# Altium PCB Embedded-DCAC-UPS-PoC.PcbDoc (part 1 of 2)
Units mm, origin at the board's own origin, x right, y up, seen from the top; angles counter-clockwise.
Board outline 165 x 165 mm, 2 copper layers (Top Layer, Bottom Layer), stack 1.58 mm thick; 80 components, 51 nets, 294 pads, 58 vias.
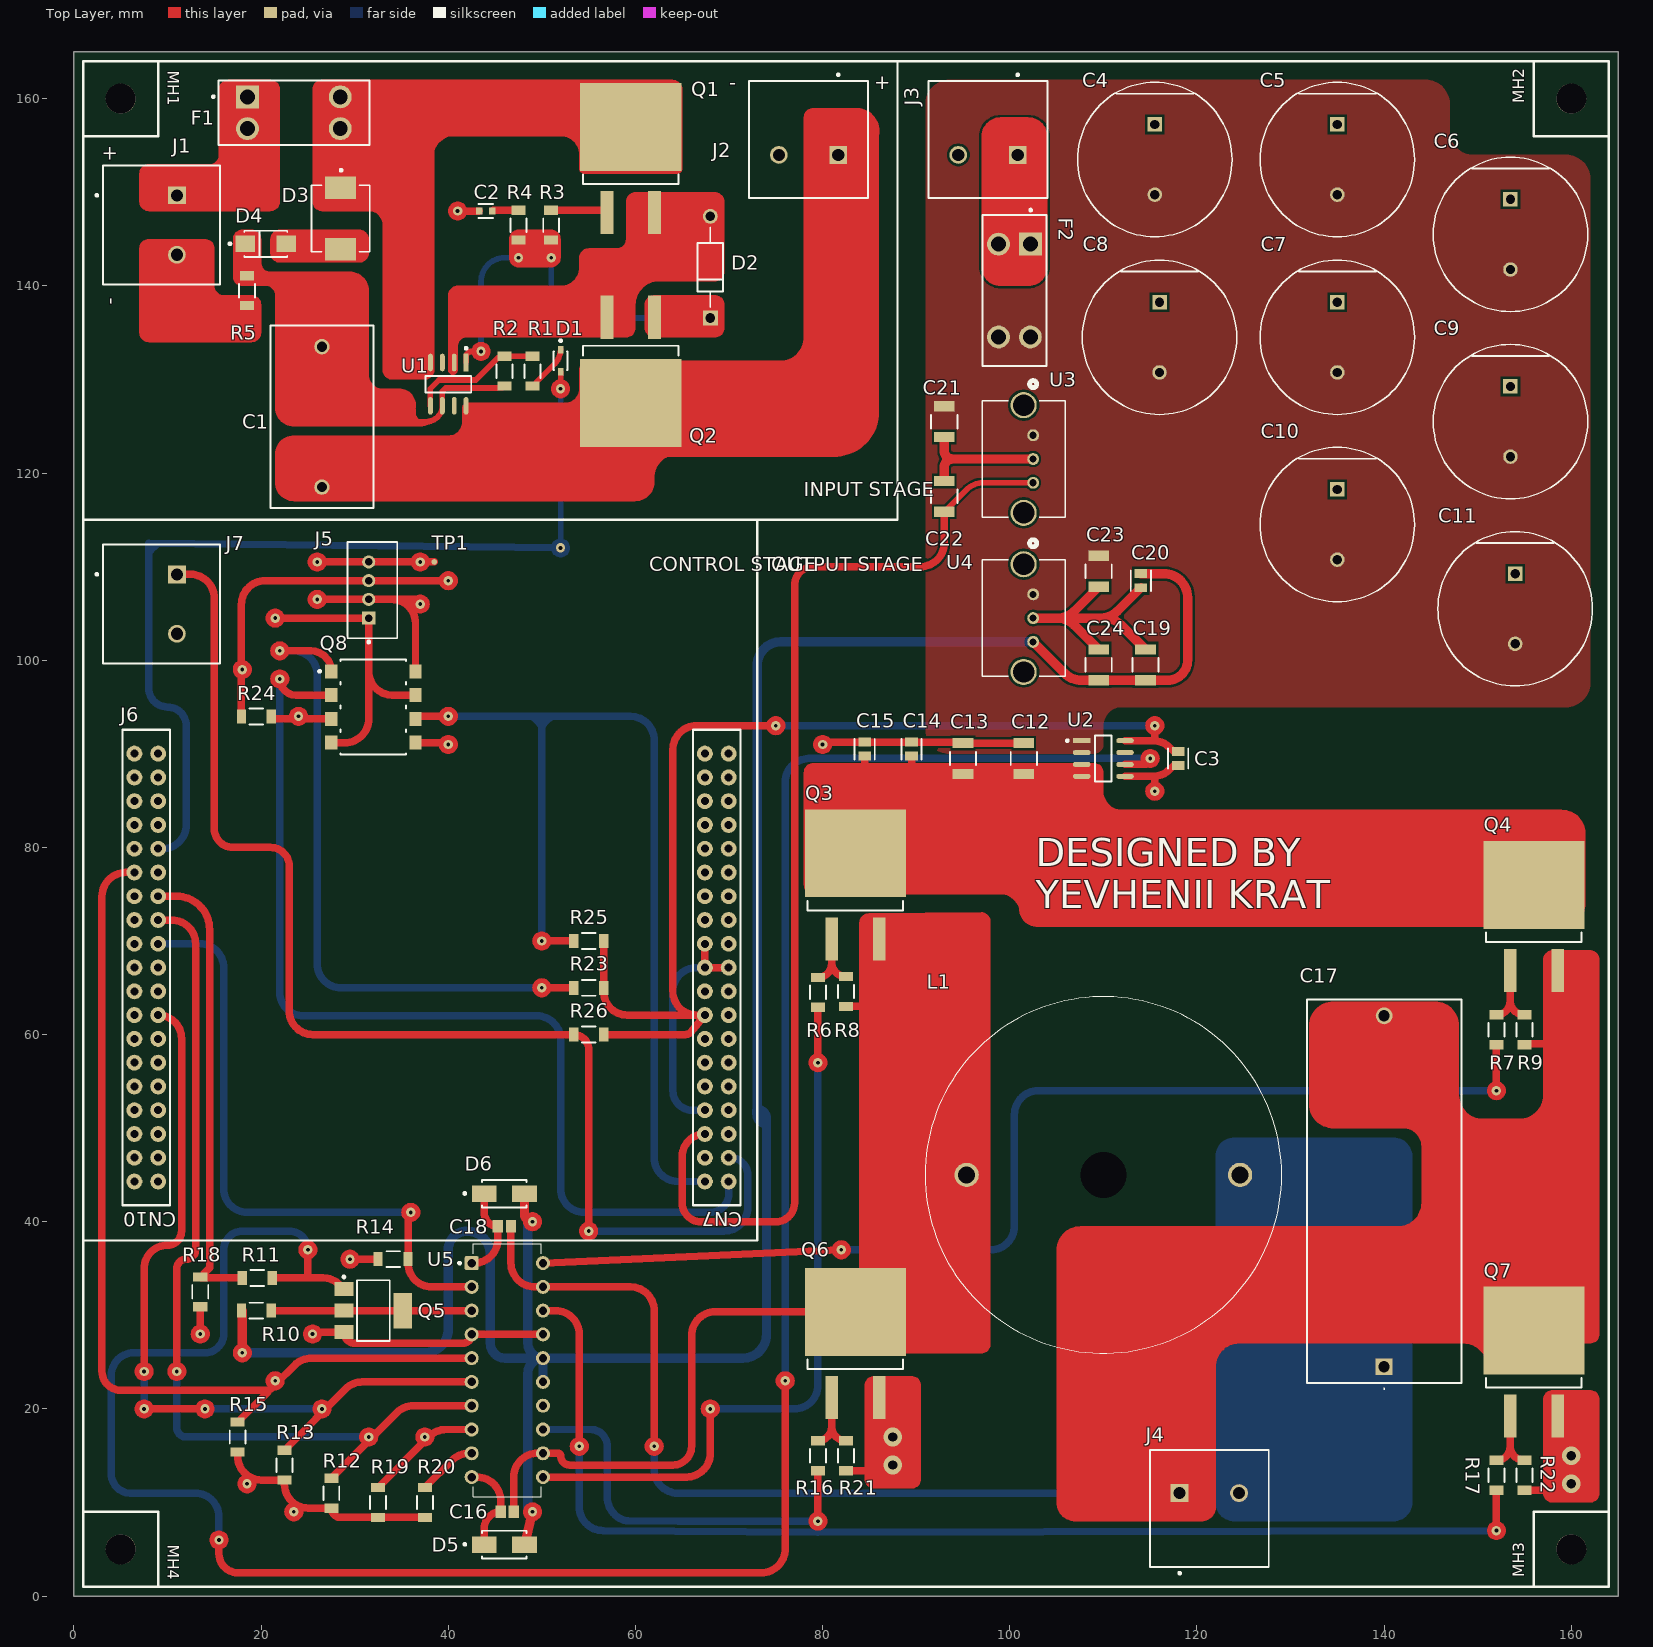
[diagram p0: Top Layer view]
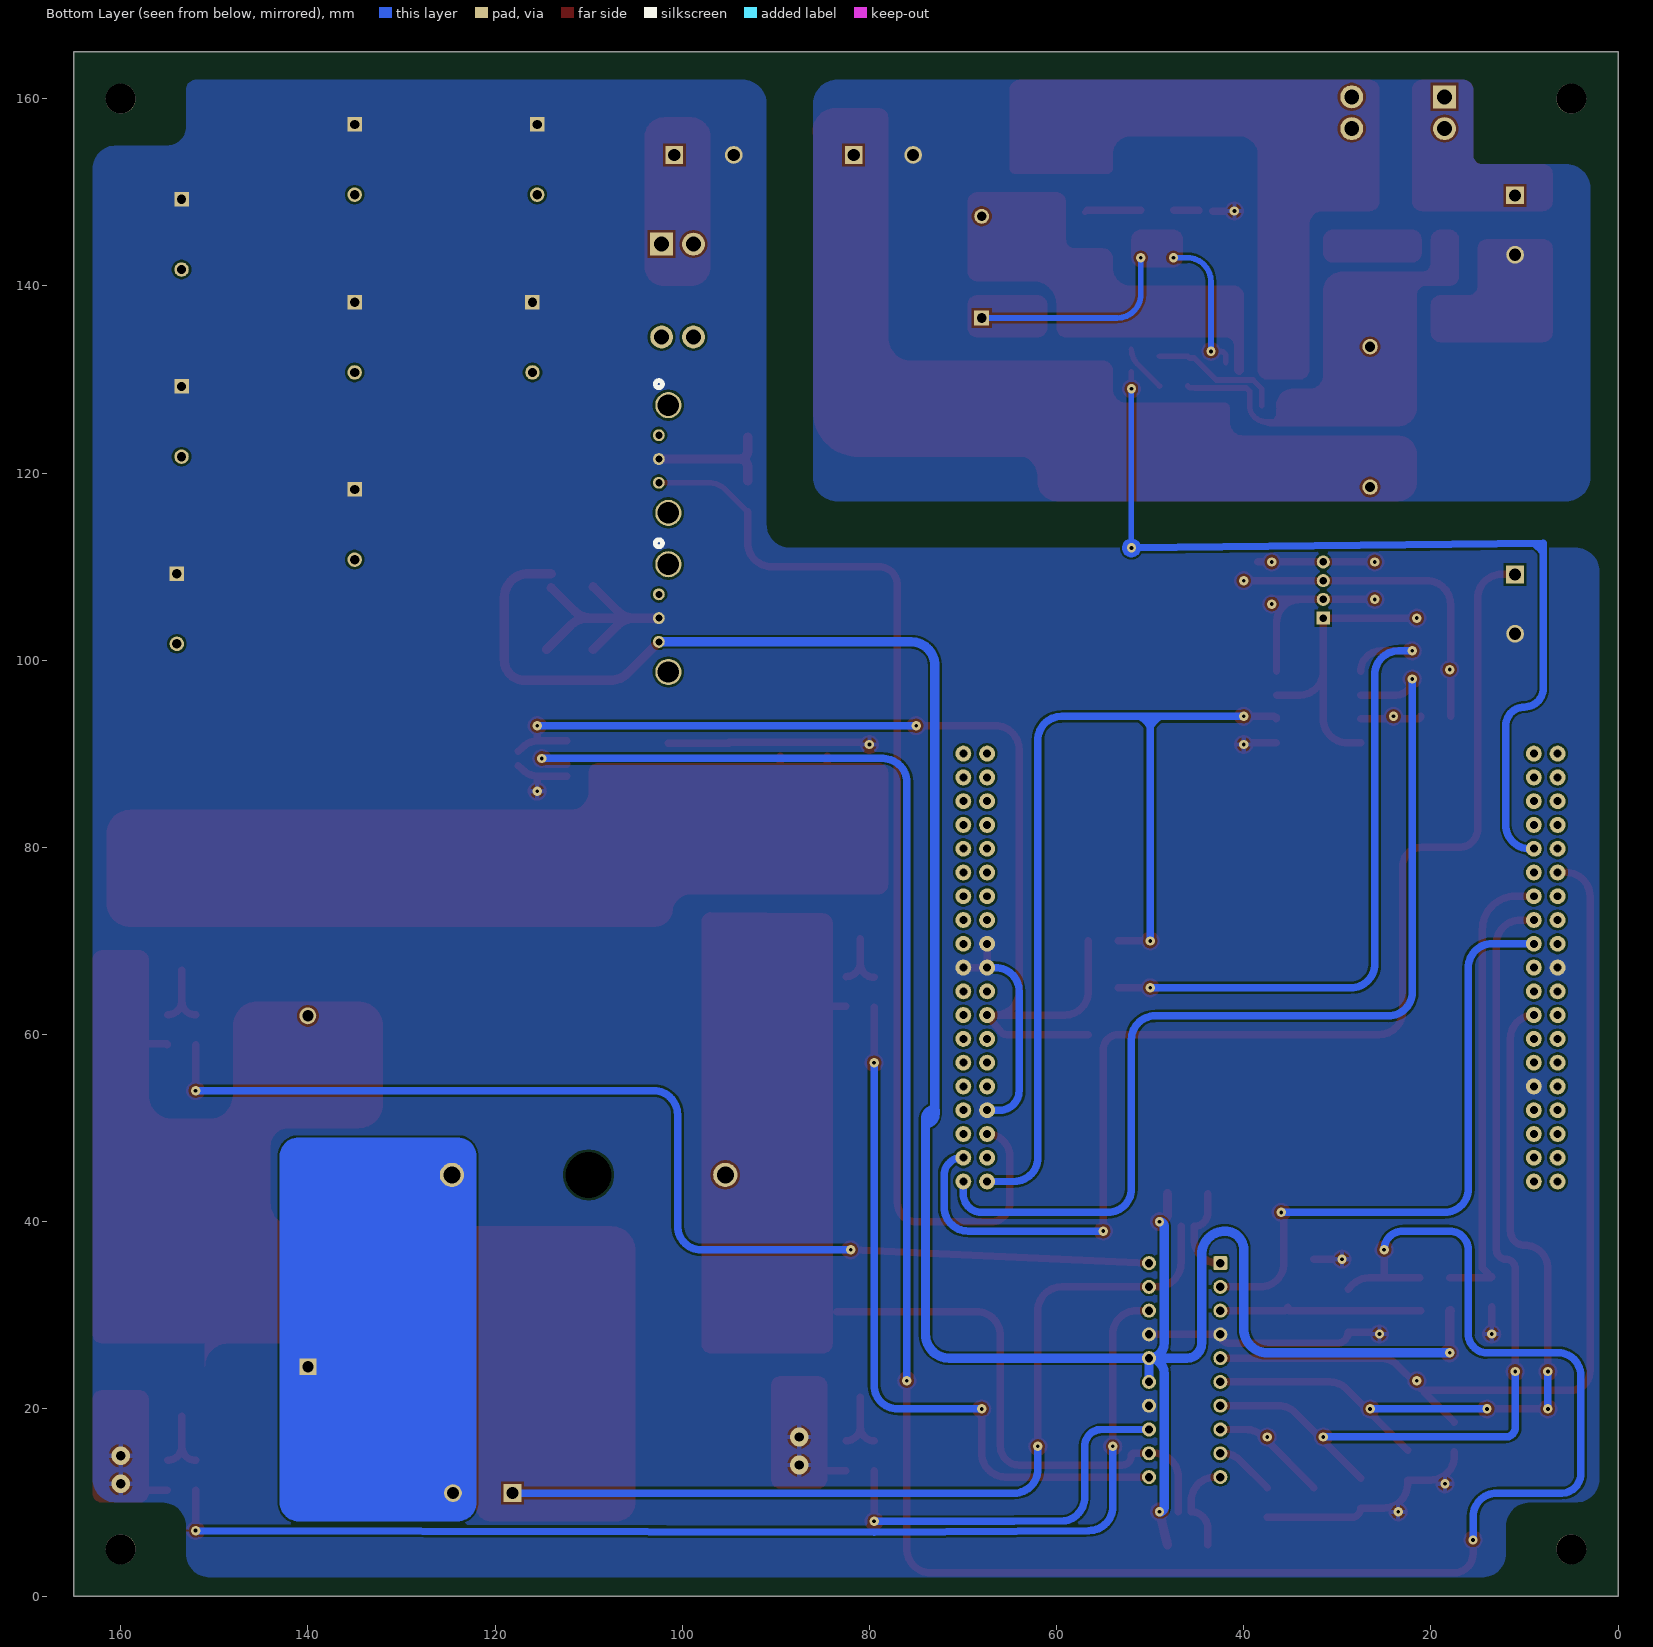
[diagram p1: Bottom Layer view, seen from below]

## Layer stack, top to bottom
Top Solder: solder mask 0.0102, Solder Resist, Dk 3.5
Top Layer: signal copper 0.0711
Dielectric 1: dielectric 1.4374, FR-4, Dk 4.8
Bottom Layer: signal copper 0.0711
Bottom Solder: solder mask 0.0102, Solder Resist, Dk 3.5

## Board outline
0,0 0,165 165,165 165,0

## Design rules (kind name [scope] priority, off if disabled: settings)
BoardOutlineClearance [All] p1: gap=0.5 ignorepadtopadclearanceinfootprint=FALSE
Clearance [All] p1: gap=0.254 ignorepadtopadclearanceinfootprint=FALSE
Height [All] p1: minheight=0 maxheight=40 prefheight=12.7
HoleSize [All] p1: absolutevalues=TRUE maxlimit=5 minlimit=0.025 maxpercent=80.000 minpercent=20.000
HoleToHoleClearance [All] p1: gap=0.5 allowstackedmicrovias=TRUE
MinimumAnnularRing [All] p1: minimumring=0.254
MinimumSolderMaskSliver [All] p1: minsoldermaskwidth=0.2
PolygonConnect [All] p1: connectstyle=Direct reliefconductorwidth=0.5 reliefentries=4 polygonreliefangle="90 Angle" airgapwidth=0.254
RoutingVias [All] p1: holewidth=0.4 width=1 viastyle="Through Hole" minholewidth=0.4 minwidth=1 maxholewidth=1 maxwidth=2
SilkToSilkClearance [All] p1: silktosilkclearance=0.15
SilkToSolderMaskClearance [IsPad] p1: minsilkscreentomaskgap=0.15 clearancetoexposedcopper=TRUE
SolderMaskExpansion [All] p1: expansion=0 istentingtop=FALSE
SupplyNets "Schematic Supply Nets_4" [InNet('BAT_OUT-')] p1: voltage=0.000
SupplyNets "Schematic Supply Nets_3" [InNet('BAT_IN+')] p2: voltage=0.000
SupplyNets "Schematic Supply Nets_2" [InNet('BAT_OUT+')] p3: voltage=0.000
SupplyNets "Schematic Supply Nets_1" [InNet('VIN+')] p4: voltage=0.000
SupplyNets "Schematic Supply Nets" [InNet('VIN-')] p5: voltage=0.000
Width [All] p1: maxlimit=5 minlimit=0.254 preferedwidth=0.5 minimp=50.000000 maximp=50.000000 favimp=50.000000
24 further rules are at their usual default settings.

## Classes and differential pairs
component class Output_Stage: C3 C4 C5 C6 C7 C8 C9 C10 C11 C12 C13 C14 C15 C16 C17 C18 C19 C20 C21 C22 C23 C24 D5 D6 F2 J3 J4 L1 Q3 Q4 Q5 Q6 Q7 R6 R7 R8 R9 R10 R11 R12 R13 R14 R15 R16 R17 R18 R19 R20 R21 R22 U2 U3 U4 U5
component class Input_Stage: C1 C2 D1 D2 D3 D4 F1 J1 J2 Q1 Q2 R1 R2 R3 R4 R5 U1
component class Control_Stage: J5 J6 J7 Q8 R23 R24 R25 R26 TP1

## Components (designator, comment, footprint, x,y, rotation, side; value= is the part's Value field where it differs from the comment)
C1 "2.2uF 5%" WCAP-FTBP_L18W10H16.5 26.5,126 r90 top
C2 "10nF 10%" FP-C1608-080-0_1-MFG 44,148 r180 top
C3 "100nF 10%" FP-C0805C-DN-MFG 118,89.5 r270 top value="0.10 μF"
C4 "680uF 20%" FP-RAD-TH-D_16_0_5-L_25_2-MFG 115.5,153.5 r270 top
C5 "680uF 20%" FP-RAD-TH-D_16_0_5-L_25_2-MFG 135,153.5 r270 top
C6 "680uF 20%" FP-RAD-TH-D_16_0_5-L_25_2-MFG 153.5,145.5 r270 top
C7 "680uF 20%" FP-RAD-TH-D_16_0_5-L_25_2-MFG 135,134.5 r270 top
C8 "680uF 20%" FP-RAD-TH-D_16_0_5-L_25_2-MFG 116,134.5 r270 top
C9 "680uF 20%" FP-RAD-TH-D_16_0_5-L_25_2-MFG 153.5,125.5 r270 top
C10 "680uF 20%" FP-RAD-TH-D_16_0_5-L_25_2-MFG 135,114.5 r270 top
C11 "680uF 20%" FP-RAD-TH-D_16_0_5-L_25_2-MFG 154,105.5 r270 top
C12 "4.7uF 10%" FP-CNA6P-MFG 101.5,89.5 r90 top value=4.7uF
C13 "4.7uF 10%" FP-CNA6P-MFG 95,89.5 r90 top value=4.7uF
C14 "100nF 10%" FP-C0805C-DN-MFG 89.5,90.5 r270 top value="0.10 μF"
C15 "100nF 10%" FP-C0805C-DN-MFG 84.5,90.5 r270 top value="0.10 μF"
C16 "1uF 25V" CAPC2013X140X50LL20T25 46.3,9 r0 top
C17 "PHE426HR8100JR06L2" PHE426HR8100JR06L2 140,24.5 r90 top
C18 "1uF 25V" CAPC2013X140X50LL20T25 46,39.5 r0 top
C19 "4.7uF 10%" FP-CNA6P-MFG 114.5,99.5 r90 top value=4.7uF
C20 "100nF 10%" FP-C0805C-DN-MFG 114,108.5 r90 top value="0.10 μF"
C21 "4.7uF 10%" FP-CNA6P-MFG 93,125.5 r90 top value=4.7uF
C22 "10uF 10%" FP-C3225-250-0_4-MFG 93,117.5 r270 top
C23 "4.7uF 10%" FP-CNA6P-MFG 109.5,109.5 r90 top value=4.7uF
C24 "10uF 10%" FP-C3225-250-0_4-MFG 109.5,99.5 r270 top
D1 "BAV21WS-E3-08" FP-S8-V-3910_02-001-MFG 52,132 r270 top
D2 "Zener 12V" FP-017AH-MFG 68,142 r90 top
D3 "TVS 33V" FP-SMCJ-MFG 28.5,147.2 r270 top
D4 "TVS 24V" FP-SMAJ-MFG 20.5,144.5 r0 top
D5 "ES1D" FP-403AE-MFG 46,5.5 r0 top value=7pF
D6 "ES1D" FP-403AE-MFG 46,43 r0 top value=7pF
F1 "Fuse Holder 30A" FP-3568-MFG 23.5,158.5 r0 top
F2 "Fuse Holder 30A" FP-3568-MFG 100.5,139.5 r270 top
J1 "10-24 AWG" PHOE-1714955_V 11,146.5 r270 top
J2 "10-24 AWG" PHOE-1714955_V 78.5,154 r180 top
J3 "10-24 AWG" PHOE-1714955_V 97.675,154 r180 top
J4 "10-24 AWG" PHOE-1714955_V 121.325,11 r0 top
J5 "110990030" FP-110990030-MFG 31.9,107.5 r90 top
J6 "NUCLEO_L476RGT6_Headers" NUCLEO_L4764RGT6_Header 38.21,67.16 r180 top
J7 "10-24 AWG" PHOE-1714955_V 11,106 r270 top
L1 "1140-101K-RC" 1140101KRC 95.395,45 r0 top
Q1 "N-MOSFET 80V" FP-PG-TO263-3-MFG 59.5,153.625 r0 top
Q2 "N-MOSFET 80V" FP-PG-TO263-3-MFG 59.5,130.875 r180 top
Q3 "AHO" FP-PG-TO263-3-MFG 83.5,76 r0 top
Q4 "BHO" FP-PG-TO263-3-MFG 156,72.625 r0 top
Q5 "PZT3904T1G" ONSC-SOT-223-4-318E-04_V 32,30.5 r0 top
Q6 "ALO" FP-PG-TO263-3-MFG 83.5,27 r0 top
Q7 "BLO" FP-PG-TO263-3-MFG 156,25 r0 top
Q8 "LTV-827S-TA1" FP-LTV-827S-TA1-MFG 32,95 r0 top
R1 "1.02kR 1% 0.25W" FP-RT1206-MFG 49,130.9 r90 top value=1.02KΩ
R2 "47kR 1% 0.25W" FP-RT1206-MFG 46,130.9 r270 top value=47KΩ
R3 "10R 1% 0.25W" FP-RT1206-MFG 51,146.5 r90 top value=10Ω
R4 "10kR 1% 0.25W" FP-RT1206-MFG 47.5,146.5 r90 top value=10KΩ
R5 "1.02kR 1% 0.25W" FP-RT1206-MFG 18.5,139.5 r270 top value=1.02KΩ
R6 "10R 1% 0.25W" FP-RT1206-MFG 79.5,64.5 r270 top value=10Ω
R7 "10R 1% 0.25W" FP-RT1206-MFG 152,60.5 r270 top value=10Ω
R8 "10kR 1%" FP-RT1206-MFG 82.5,64.6 r270 top value=10KΩ
R9 "10kR 1%" FP-RT1206-MFG 155,60.5 r270 top value=10KΩ
R10 "10kR 1% 0.25W" FP-RT1206-MFG 19.5,30.5 r0 top value=10KΩ
R11 "4.7kR 1% 0.25W" FP-RT1206-MFG 19.6,34 r0 top value=4.7KΩ
R12 "4.7kR 1% 0.25W" FP-RT1206-MFG 27.5,11 r90 top value=4.7KΩ
R13 "4.7kR 1% 0.25W" FP-RT1206-MFG 22.5,14 r90 top value=4.7KΩ
R14 "4.7kR 1% 0.25W" FP-RT1206-MFG 34.1,36 r0 top value=4.7KΩ
R15 "4.7kR 1% 0.25W" FP-RT1206-MFG 17.5,17 r90 top value=4.7KΩ
R16 "10R 1% 0.25W" FP-RT1206-MFG 79.5,15 r270 top value=10Ω
R17 "10R 1% 0.25W" FP-RT1206-MFG 152,12.9 r270 top value=10Ω
R18 "100k 0.1%" FP-RT1206-MFG 13.5,32.5 r270 top value=100KΩ
R19 "100k 0.1%" FP-RT1206-MFG 32.5,10 r270 top value=100KΩ
R20 "100k 0.1%" FP-RT1206-MFG 37.5,10 r270 top value=100KΩ
R21 "10kR 1%" FP-RT1206-MFG 82.5,15 r270 top value=10KΩ
R22 "10kR 1%" FP-RT1206-MFG 155,12.9 r270 top value=10KΩ
R23 "680R 1% 0.25W" FP-RT1206-MFG 55,65 r180 top value=680Ω
R24 "680R 1% 0.25W" FP-RT1206-MFG 19.5,94 r0 top value=680Ω
R25 "3.3kR 1% 0.25W" FP-RT1206-MFG 55,70 r180 top value=3.3KΩ
R26 "10kR 1% 0.25W" FP-RT1206-MFG 55,60 r180 top value=10KΩ
TP1 "TPAD6R" TP06R 38.5,110.5 r0 top
U1 "IDEAL DIODE CONTROLLER" FP-S8-8-05-08-1610-IPC_C 40,129.5 r270 top
U2 "ACS711ELCTR-12AB-T" FP-LC-8-IPC_C 110,89.5 r0 top
U3 "TSR 1-4850WI" TSR1WI-SINGLE_TRP 102.5,124.04 r270 top
U4 "TSR 1-48120WI" TSR1WI-SINGLE_TRP 102.5,107.04 r270 top
U5 "HIP4081AIPZ" DIP762W46P254L2590H533Q20_E20_3_N 46.31,24.15 r0 top

## Footprints (in the part's own frame and the unit in brackets; to place one, negate y for a bottom-side part, rotate by r counter-clockwise, add the part's x,y. Pads: shape width x height; smd on the part's side, far side on the other; paste and mask are expansions set on the pad)
1140101KRC [mm]
  round 2.6 hole 1.826: 1(0,0) 2(29.21,0)
  round 2.451 hole 4.902 unplated: 3(14.605,0)
  silkscreen extent -4.44,-19.05 33.66,19.05, body extent -4.45,-19.05 33.65,19.05, height 26.35
CAPC2013X140X50LL20T25 [mm] "Chip Capacitor, 2-Leads, Body 2.00x1.25mm, IPC High Density"
  rect 1.1x1.35 smd: 1(-0.7,0) 2(0.7,0)
  body extent -1.1,-0.72 1.1,0.72, height 1.4
DIP762W46P254L2590H533Q20_E20_3_N [mm] "DIP, Lead Span 7.62mm, Lead Width 0.46mm, Pitch 2.54mm, Body Length 25.90mm, Height 5.33mm, IPC Medium Density"
  rrect25% 1.5x1.5 hole 0.9: 1(-3.81,11.43)
  round 1.5 hole 0.9: 2(-3.81,8.89) 3(-3.81,6.35) 4(-3.81,3.81) 5(-3.81,1.27) 6(-3.81,-1.27) 7(-3.81,-3.81) 8(-3.81,-6.35) 9(-3.81,-8.89) 10(-3.81,-11.43) 11(3.81,-11.43) 12(3.81,-8.89) 13(3.81,-6.35) 14(3.81,-3.81) 15(3.81,-1.27) 16(3.81,1.27) 17(3.81,3.81) 18(3.81,6.35) 19(3.81,8.89) 20(3.81,11.43)
  silkscreen extent -5.23,-13.51 3.62,13.51, body extent -3.95,-12.95 3.95,12.95, height 5.33
FP-017AH-MFG [mm]
  rect 1.6x1.6 hole 1.05 paste-2539.97 mask+0: 1(-5.438,0)
  round 1.6 hole 1.05 paste-2539.97 mask+0: 2(5.438,0)
  silkscreen extent -4.24,-1.36 4.24,1.36, body extent -6.34,-1.46 6.34,1.46, height 0.25
FP-403AE-MFG [mm]
  rect 2.65x1.75 smd paste+0 mask+0: 1(-2.15,0) 2(2.15,0)
  silkscreen extent -4.35,-1.48 2.37,1.48, body extent -3.57,-1.58 3.57,1.58, height 0.25
FP-3568-MFG [mm]
  round 2.45 hole 1.6 paste-2539.97 mask+0: 1(-4.96,-1.7) 2(4.96,-1.7) 2(4.96,1.7)
  rect 2.45x2.45 hole 1.6 paste-2539.97 mask+0: 1(-4.96,1.7)
  silkscreen extent -8.72,-3.43 8.07,3.43, body extent -8.17,-3.53 8.17,3.53, height 0.25
FP-110990030-MFG [mm]
  rect 1.4x1.4 hole 0.8 paste-2539.97 mask+0: 1(-3,0.4)
  round 1.4 hole 0.8 paste-2539.97 mask+0: 2(-1,0.4) 3(1,0.4) 4(3,0.4)
  silkscreen extent -5.67,-2.65 5.15,2.65, body extent -5.25,-2.75 5.25,2.75, height 0.25
FP-C0805C-DN-MFG [mm]
  rect 0.95x1.35 smd paste+0 mask+0: 1(-0.75,0) 2(0.75,0)
  silkscreen extent -1.1,-1.07 1.1,1.07, body extent -1.4,-0.85 1.4,0.85, height 0.25
FP-C1608-080-0_1-MFG [mm]
  rect 0.7x0.7 smd paste+0 mask+0: 1(-0.7,0) 2(0.7,0)
  silkscreen extent -0.8,-0.75 0.8,0.75, body extent -1.15,-0.55 1.15,0.55, height 0.25
FP-C3225-250-0_4-MFG [mm]
  rect 1.1x2.2 smd paste+0 mask+0: 1(-1.65,0) 2(1.65,0)
  silkscreen extent -0.72,-1.4 0.72,1.4, body extent -2.3,-1.5 2.3,1.5, height 0.25
FP-CNA6P-MFG [mm]
  rect 1.1x2.2 smd paste+0 mask+0: 1(-1.65,0) 2(1.65,0)
  silkscreen extent -0.72,-1.4 0.72,1.4, body extent -2.3,-1.5 2.3,1.5, height 0.25
FP-LC-8-IPC_C [mm]
  rect 1.874x0.542 smd paste+0 mask+0: 1(-2.316,1.905)
  rrect100% 1.874x0.542 smd paste+0 mask+0: 2(-2.316,0.635) 3(-2.316,-0.635) 4(-2.316,-1.905) 5(2.316,-1.905) 6(2.316,-0.635) 7(2.316,0.635) 8(2.316,1.905)
  silkscreen extent -3.97,-2.45 0.88,2.45, body extent -3.35,-2.55 3.35,2.55, height 0.25
FP-LTV-827S-TA1-MFG [mm]
  rect 1.3x1.5 smd paste+0 mask+0: 1(-4.5,3.81) 2(-4.5,1.27) 3(-4.5,-1.27) 4(-4.5,-3.81) 5(4.5,-3.81) 6(4.5,-1.27) 7(4.5,1.27) 8(4.5,3.81)
  silkscreen extent -5.87,-5.09 3.5,5.09, body extent -5.25,-5.19 5.25,5.19, height 0.25
FP-PG-TO263-3-MFG [mm]
  rect 1.35x4.6 smd paste-1000 mask+0: 1(-2.54,-5.775) 3(2.54,-5.775)
  rect 10.8x9.4 smd paste-1000 mask+0: 4(0,3.375)
  silkscreen extent -5.1,-2.73 5.1,-1.7, body extent -5.5,-8.18 5.5,8.18, height 0.25
FP-RAD-TH-D_16_0_5-L_25_2-MFG [mm]
  rect 1.55x1.55 hole 1 paste-2539.97 mask+0: 1(-3.75,0)
  round 1.55 hole 1 paste-2539.97 mask+0: 2(3.75,0)
  silkscreen extent -8.25,-8.25 8.25,8.25, body extent -8.35,-8.35 8.35,8.35, height 0.25
FP-RT1206-MFG [mm]
  rect 1x1.5 smd paste+0 mask+0: 1(-1.6,0) 2(1.6,0)
  silkscreen extent -0.72,-0.85 0.72,0.85, body extent -2.2,-0.95 2.2,0.95, height 0.25
FP-S8-8-05-08-1610-IPC_C [mm]
  rect 1.877x0.521 smd paste+0 mask+0: 1(-2.313,1.905)
  rrect100% 1.877x0.521 smd paste+0 mask+0: 2(-2.313,0.635) 3(-2.313,-0.635) 4(-2.313,-1.905) 5(2.313,-1.905) 6(2.313,-0.635) 7(2.313,0.635) 8(2.313,1.905)
  silkscreen extent -3.95,-2.45 0.87,2.45, body extent -3.35,-2.55 3.35,2.55, height 0.25
FP-S8-V-3910_02-001-MFG [mm]
  rect 0.8x0.6 smd paste+0 mask+0: 1(-1.2,0) 2(1.2,0)
  silkscreen extent -2.27,-0.75 0.97,0.75, body extent -1.7,-0.85 1.7,0.85, height 0.25
FP-SMAJ-MFG [mm]
  rect 2.1x1.8 smd paste+0 mask+0: 1(-2.2,0) 2(2.2,0)
  silkscreen extent -3.95,-1.4 2.3,1.4, body extent -3.35,-1.5 3.35,1.5, height 0.25
FP-SMCJ-MFG [mm]
  rect 2.4x3.3 smd paste+0 mask+0: 1(-3.3,0) 2(3.3,0)
  silkscreen extent -5.27,-3.11 3.55,3.11, body extent -4.6,-3.21 4.6,3.21, height 0.25
NUCLEO_L4764RGT6_Header [mm]
  round 1.7 hole 0.85: 1(-31.75,22.86) 2(-29.21,22.86) 3(-31.75,20.32) 4(-29.21,20.32) 5(-31.75,17.78) 6(-29.21,17.78) 7(-31.75,15.24) 8(-29.21,15.24) 9(-31.75,12.7) 10(-29.21,12.7) 11(-31.75,10.16) 12(-29.21,10.16) 13(-31.75,7.62) 14(-29.21,7.62) 15(-31.75,5.08) 16(-29.21,5.08) 17(-31.75,2.54) 18(-29.21,2.54) 19(-31.75,0) 20(-29.21,0) 21(-31.75,-2.54) 22(-29.21,-2.54) 23(-31.75,-5.08) 24(-29.21,-5.08) 25(-31.75,-7.62) 26(-29.21,-7.62) 27(-31.75,-10.16) 28(-29.21,-10.16) 29(-31.75,-12.7) 30(-29.21,-12.7) 31(-31.75,-15.24) 32(-29.21,-15.24) 33(-31.75,-17.78) 34(-29.21,-17.78) 35(-31.75,-20.32) 36(-29.21,-20.32) 37(-31.75,-22.86) 38(-29.21,-22.86) 39(29.21,22.86) 40(31.75,22.86) 41(29.21,20.32) 42(31.75,20.32) 43(29.21,17.78) 44(31.75,17.78) 45(29.21,15.24) 46(31.75,15.24) 47(29.21,12.7) 48(31.75,12.7) 49(29.21,10.16) 50(31.75,10.16) 51(29.21,7.62) 52(31.75,7.62) 53(29.21,5.08) 54(31.75,5.08) 55(29.21,2.54) 56(31.75,2.54) 57(29.21,0) 58(31.75,0) 59(29.21,-2.54) 60(31.75,-2.54) 61(29.21,-5.08) 62(31.75,-5.08) 63(29.21,-7.62) 64(31.75,-7.62) 65(29.21,-10.16) 66(31.75,-10.16) 67(29.21,-12.7) 68(31.75,-12.7) 69(29.21,-15.24) 70(31.75,-15.24) 71(29.21,-17.78) 72(31.75,-17.78) 73(29.21,-20.32) 74(31.75,-20.32) 75(29.21,-22.86) 76(31.75,-22.86)
  silkscreen extent -33.02,-25.4 33.02,25.4, body extent -33.02,-24.09 33.02,24.09, height 7.2
ONSC-SOT-223-4-318E-04_V [mm] "SOT223, 4-Leads, Body 6.5x3.5mm, Pitch 2.3mm"
  rect 2x1.5 smd: 1(-3.15,2.3) 2(-3.15,0) 3(-3.15,-2.3)
  rect 2x3.8 smd: 4(3.15,0)
  silkscreen extent -3.27,-3.25 1.75,3.72, body extent -1.75,-3.25 1.75,3.25, height 1.75
PHE426HR8100JR06L2 [mm]
  rect 1.8x1.8 hole 1.2: 1(0,0)
  round 1.8 hole 1.2: 2(37.5,0)
  silkscreen extent -2.4,-8.25 39.25,8.25, body extent -1.75,-8.25 39.25,8.25, height 32.1
PHOE-1714955_V [mm] "Terminal Block, 2-Leads, Body 12.7x12.5mm, Pitch 6.35mm"
  rect 1.9x1.9 hole 1.3: 1(-3.175,0)
  round 1.9 hole 1.3: 2(3.175,0)
  silkscreen extent -6.35,-8.67 6.35,4.6, body extent -6.92,-7.9 6.35,4.6, height 21.51
TP06R [mm] "Testpoint, round, d=0.6mm"
  round 0.6 smd paste-1: 1(0,0)
TSR1WI-SINGLE_TRP [mil]
  round 50 / inner round 60 / far side round 50 hole 30 paste-99999 mask+0: 1(0,0) 2(100,0) 3(200,0)
  round 110 / inner round 60 / far side round 110 hole 90 paste-99999 mask-55: 4(-126.5,-40) 5(326.5,-40)
  silkscreen extent -230,-215 345,135
WCAP-FTBP_L18W10H16.5 [mm] "Film Capacitors, 18.00 x 10.00 mm"
  round 1.65 hole 1.1: 1(-7.5,0) 2(7.5,0)
  silkscreen extent -9.75,-5.5 9.75,5.5, body extent -9,-5 9,5, height 16.55

## Part data
C1: library part CMP-03913-89437347-3, "890443325010CS / Cap, 2.2Uf, 160V, Film, Radial Rohs Compliant: Yes", Capacitance=2.2µF, ESR (Equivalent Series Resistance)=10.5mΩ, Insulation Resistance=4.55GΩ, Max Operating Temperature=105°C, Min Operating Temperature=-40°C, Voltage Rating=160V, Height=16.5mm, Length=18mm, Packaging=Carton, Pin Length=4mm, Pitch=15mm, RoHS=Compliant, Width=10mm
C2: library part CMP-08246-003501-1, "C1608X7R2A103K080AA / Multilayer Ceramic Capacitors 10nF ±10% 100V X7R SMD 0603", Capacitance=10nF, Case Code (Imperial)=0603, Case Code (Metric)=1608, Dielectric=X7R, Max Operating Temperature=125°C, Min Operating Temperature=-55°C, Package Quantity=1, Resistor Type=Ceramic, Tolerance=10%, Voltage=100V, Case/Package=0603, Construction=Flat, Depth=0.8mm, Height=0.8mm, Lead Free="Lead Free", Length=1.6mm, Mount="Surface Mount", Number of Pins=2, Packaging="Tape and Reel", Radiation Hardening=No, REACH SVHC="No SVHC", RoHS Compliant=Yes, Series=C, Termination=SMD/SMT, Thickness=0.037inch, Voltage Rating=100V, Voltage Rating (DC)=100V, Weight=7.1E-05oz, Width=0.8mm
C3 C14 C15 C20: library part CMP-2007-00279-2, "C0805C104K5RACTU / CAP CER 0.1UF 50V X7R 0805", Capacitance="0.10 μF", Manufacturer=KEMET, Manufacturer Part Number=C0805C104K5RACTU, Package=C0805C-DN, Temperature="-55°C to +125°C", Temperature Characteristic=X7R, Temperature Coefficient=30ppm/°C, Temperature Range High=+125°C, Temperature Range Low=-55°C, Tolerance=0.1, Voltage Rating="50 V", Automotive=No, Category=Cap, ComponentLink2Description=Datasheet, ComponentLink2URL=https://content.kemet.com/datasheets/KEM_C1003_C0G_SMD.pdf, Device Class L1="Passive Components", Device Class L2=Capacitors, Device Class L3="Ceramic Capacitors", Digikey Description="CAP CER 0.1UF 50V X7R 0805", Height=0.88mm, Ipc Land Pattern Name=CAPC200125X78, Lead Free=Yes, Material=Ceramic, Mouser Description="Cap Ceramic 0.1uF 50V X7R 10% SMD 2.0 x 1.2 mm 125 C Paper T/R", Octopart=https://octopart.com/c0805c104k5ractu-kemet-143926, RoHS=TRUE
C4 C5 C6 C7 C8 C9 C10 C11: library part CMP-05427-001257-1, "EEUFS1K681B / Aluminum Electrolytic Capacitors (Radial Lead Type) 680uF ±20% 80V", RoHS Compliant=Yes
C12 C13 C19 C21 C23: library part CMP-08246-000008-1, "CNA6P1X7R2A475K250AE / CAP CER 4.7UF 100V X7R 1210", Capacitance=4.7uF, Manufacturer=TDK, Manufacturer Part Number=CNA6P1X7R2A475K250AE, Package=CNA6P, Temperature="-55°C to +125°C", Temperature Characteristic=X7R, Temperature Coefficient=15%, Temperature Range High=+125°C, Temperature Range Low=-55°C, Tolerance=10%, Voltage Rating=100V, Automotive=Yes, Automotive Grade="Grade 1", Category=Cap, ComponentLink2Description=Datasheet, ComponentLink2URL=https://product.tdk.com/info/en/catalog/datasheets/mlcc_automotive_soft_cna_en.pdf, Device Class L1="Passive Components", Device Class L2=Capacitors, Device Class L3="Ceramic Capacitors", Digikey Description="CAP CER 4.7UF 100V X7R 1210", Footprint Url=https://product.tdk.com/info/en/catalog/spec/mlccspec_automotive_soft_cna_en.pdf, Height=2.8mm, Ipc Land Pattern Name=CAPC320250X250, Lead Free=Yes, Material=Ceramic, Octopart=https://octopart.com/cna6p1x7r2a475k250ae-tdk-96979044, RoHS=TRUE
C16 C18: library part CMP-2007-03234-1, "C0805C105K3RACTU", Manufacturer=Kemet, Part Number=C0805C105K3RACTU
C17: "Capacitor", Manufacturer_Name="Yageo Group", Mouser Part Number=80-PHE426HR8100JR6L2, Datasheet Link=https://search.kemet.com/component-documentation/download/specsheet/F426RK106J250C, Height=32mm, Manufacturer_Part_Number=PHE426HR8100JR06L2, Mouser Price/Stock=https://www.mouser.co.uk/ProductDetail/KEMET/PHE426HR8100JR06L2?qs=LpuuGx8iR2QFB19k2AHYGw%3D%3D
C22 C24: library part CMP-08246-003742-1, "C3225X7R1N106K250AC / Multilayer Ceramic Capacitors 10uF ±10% 75V X7R SMD 1210", RoHS Compliant=Yes
D1: library part CMP-02540-000084-1, "DIODE GEN PURP 200V 250MA SOD323", Average Rectified Current=250mA, Case/Package=SOD-323-2, Diode Capacitance-Max=1.5pF, Forward Current=200mA, Forward Voltage=1.25V, Max Forward Surge Current (Ifsm)=1A, Max Operating Temperature=150°C, Max Power Dissipation=200mW, Max Repetitive Reverse Voltage (Vrrm)=250V, Max Reverse Current=15uA, Max Reverse Leakage Current=100nA, Max Reverse Voltage (DC)=200V, Max Surge Current=625mA, Min Operating Temperature=-55°C, Package Quantity=15000, Contact Plating=Tin, Element Configuration=Single, Lead Free="Lead Free", Mount="Surface Mount", Number of Pins=2, Packaging="Tape and Reel", Peak Non-Repetitive Surge Current=1A, Power Dissipation=200mW, Reverse Recovery Time=50ns, Reverse Recovery Time-Max=50ns, RoHS Compliant=Yes, Series="Automotive, AEC-Q101", Weight=0.000152oz
D2: library part CMP-07164-000008-1, "BZX85C12 / DIODE ZENER 12V 1W DO41", Forward Current=200mA, Manufacturer="ON Semiconductor", Manufacturer Part Number=BZX85C12, Max Junction Temp=+200°C, Max Reverse Leakage Current=0.5uA, Max Zener Voltage=12.7V, Nom Zener Voltage=12V, Package=017AH, Power Dissipation=1W, Reverse Voltage=8.4V, Temperature="-65°C to +200°C", Temperature Range Low=-65°C, Automotive=No, Category=Diode, ComponentLink2Description=Datasheet, ComponentLink2URL=https://www.onsemi.com/pub/Collateral/BZX85C3V3-D.PDF, Device Class L1="Discrete Semiconductors", Device Class L2=Diodes, Device Class L3="Zener Diodes", Digikey Description="DIODE ZENER 12V 1W DO41", Footprint Url=https://www.onsemi.com/pub/Collateral/017AH.PDF, Height=2.72mm, Ipc Land Pattern Name=DIOPA1088W105L520D272, Lead Free=Yes, Mouser Description="Zener Diodes 12V 1W Zener", Octopart=https://octopart.com/bzx85c12-on+semiconductor-84409056, RoHS=TRUE, Temperature Range High=+200°C, Zener Impedance=9Ω
D3: library part CMP-2000-07107-2, "SMCJ33A / TVS DIODE 33V 53.3V DO214AB", Breakdown Voltage=36.7V, Clamping Voltage=53.3V, Manufacturer="Littelfuse Inc", Manufacturer Part Number=SMCJ33A, Max Junction Temp=+150°C, Package=SMCJ, Peak Pulse Current=28.2A, Peak Pulse Power=1500W, Reverse Standoff Voltage=33V, Temperature="-65°C to +150°C", Temperature Range Low=-65°C, Automotive=No, Category=Diode, ComponentLink2Description=Datasheet, ComponentLink2URL=https://upverter.com/datasheet/776ad76c8c447792c68262141a14e01aaf7c6fbe.pdf, Device Class L1="Circuit Protection", Device Class L2="TVS Diodes", Device Class L3=unset, Digikey Description="TVS DIODE 33V 53.3V DO214AB", Direction=Unidirectional, Height=2.62mm, Lead Free=Yes, Mouser Description="Diode Transient Voltage Suppressor (TVS) Single Uni Directional 33V 1.5KW 2-Pin SMC T/R", Number Of Channels=1, Octopart=https://octopart.com/smcj33a-littelfuse-351660, RoHS=TRUE, Temperature Range High=+150°C
D4: library part CMP-08607-000085-1, "SMAJ24A / TVS DIODE 24V 38.9V DO214AC", Breakdown Voltage=26.7V, Clamping Voltage=38.9V, Manufacturer="Littelfuse Inc", Manufacturer Part Number=SMAJ24A, Max Junction Temp=+150°C, Package=SMAJ, Peak Pulse Current=10.3A, Peak Pulse Power=400W, Reverse Standoff Voltage=24V, Temperature="-65°C to +150°C", Temperature Range Low=-65°C, Automotive=No, Category=Diode, ComponentLink2Description=Datasheet, ComponentLink2URL=https://www.littelfuse.com/~/media/electronics/datasheets/tvs_diodes/littelfuse_tvs_diode_smaj_datasheet.pdf.pdf, Device Class L1="Circuit Protection", Device Class L2="TVS Diodes", Device Class L3=unset, Digikey Description="TVS DIODE 24V 38.9V DO214AC", Direction=Unidirectional, Height=2.29mm, Lead Free=Yes, Mouser Description="In a Pack of 25, Littelfuse SMAJ24A, Uni-Directional TVS Diode, 400W, 2-Pin DO-214AC", Number Of Channels=1, Octopart=https://octopart.com/smaj24a-littelfuse-350003, RoHS=TRUE, Temperature Range High=+150°C
D5 D6: library part CMP-2000-06230-3, "DIODE GEN PURP 200V 1A SMA", Capacitance=7pF, Forward Current=1A, Manufacturer="ON Semi", Max Junction Temp=+150°C, Max Repetitive Reverse Voltage=200V, Max Surge Forward Current=30A, Package=403AE, Peak Reverse Current=5uA, Temperature="-50°C to +150°C", Temperature Range Low=-50°C, Automotive=No, Category=Diode, ComponentLink2Description=Datasheet, ComponentLink2URL=https://www.onsemi.jp/PowerSolutions/document/ES1D-D.PDF, Device Class L1="Discrete Semiconductors", Device Class L2=Diodes, Device Class L3="Rectifier Diodes", Digikey Description="DIODE GEN PURP 200V 1A SMA", Footprint Url=http://www.onsemi.com/pub/Collateral/403AE.PDF, Height=2.5mm, Lead Free=Yes, Manufacturer Part Number=ES1D, Octopart=https://octopart.com/es1d-on+semiconductor-84324855, RoHS=TRUE, Standoff Height=0.05mm, Temperature Range High=+150°C
F1 F2: library part CMP-2000-05464-2, "3568", Color=Black, Current Rating=20A, Flammability Rating="UL94 V-0", Max Operating Temperature=145°C, Min Operating Temperature=-50°C, Voltage=500V, Approvals=UL, Body Material=Nylon, Contact Material=Brass, Contact Plating=Tin, Depth=6.73mm, Fuse Current=20A, Illumination Type=Illuminated, Lead Free="Lead Free", Length=16mm, Material="Brass, Nylon, Tin", Mount="PCB, Vertical", NexarPartId=8116161, Number of Circuits=1, Number of Poles=1, Orientation=Vertical, REACH SVHC="No SVHC", RoHS=Compliant, Termination="PC Pin", Voltage Rating (AC)=500V
J1 J2 J3 J4 J7: library part CMP-2000-05797-1, "1714955 / PC Terminal Block, Pitch 6.35 mm, 1 x 2 Position, Height 21.5 mm, Tail Lenght 5.1 mm, RoHS, Bulk", Manufacturer="Phoenix Contact", Package Description="PC Terminal Block, Pitch 6.35 mm, 1 x 2 Position, Height 21.5 mm, Tail Lenght 5.1 mm", Package Reference=1714955, Datasheet URL=http://media.digikey.com/pdf/Data%20Sheets/Phoenix%20Contact%20PDFs/1714955.pdf, Datasheet Version=02/2010, Manufacturer URL=http://www.phoenixcontact.com/, Mounting Technology=ThroughHole
J5: library part CMP-139044-000001-1, "GROVE 2MM 4PIN VERT CONN 10PCS", Series=-
J6: "Headers for NUCLEO L476RG T6 Board.", Manufacturer="Amphenol FCI", Manufacturer Part Number=76342-319LF, Supplier Part Number 1=649-76342-319LF, ComponentLink1Description="Mouser Link", ComponentLink1URL=https://www.mouser.pl/ProductDetail/Amphenol-FCI/76342-319LF?qs=5xI8GKdkXlkDdCCMwMnBAg%3D%3D, Supplier 1=Mouser
L1: "Inductor", Manufacturer_Name=Bourns, Mouser Part Number=542-1140-101K-RC, Arrow Part Number=1140-101K-RC, Arrow Price/Stock=https://www.arrow.com/en/products/1140-101k-rc/bourns?region=europe, Datasheet Link=http://www.bourns.com/docs/Product-Datasheets/1140_series.pdf, Height=26.162mm, Manufacturer_Part_Number=1140-101K-RC, Mouser Price/Stock=https://www.mouser.co.uk/ProductDetail/Bourns/1140-101K-RC?qs=OvPYepjWVtSJktibIwUvvA%3D%3D
Q1 Q2 Q3 Q4 Q6 Q7: library part CMP-32901-001127-1, "IPB031N08N5ATMA1 / MOSFET N-CH 80V 120A D2PAK", Case/Package=TO-263-3, Continuous Drain Current (ID)=120A, Drain to Source Breakdown Voltage=80V, Drain to Source Resistance=4.1mR, Gate to Source Voltage (Vgs)=20V, Input Capacitance=6.24nF, Max Operating Temperature=175°C, Max Power Dissipation=167W, Min Operating Temperature=-55°C, Package Quantity=1000, Drain to Source Voltage (Vdss)=80V, Element Configuration=Single, Fall Time=12ns, Halogen Free="Halogen Free", Lead Free="Contains Lead", Max Dual Supply Voltage=80V, Mount="Surface Mount", Number Of Channels=1, Number of Pins=3, Packaging="Tape and Reel", Polarity=N-CHANNEL, Rds On Max=3.1mR, Rise Time=18ns, RoHS Compliant=Yes, Series=OptiMOS™, Turn-Off Delay Time=37ns, Turn-On Delay Time=18ns, Weight=0.139332oz
Q5: library part CMP-1048-00481-1, "General Purpose Transistor, NPN Silicon, 4-Pin SOT-223, Pb-Free, Tape and Reel", Manufacturer="On Semiconductor", ComponentLink1Description="Manufacturer URL", ComponentLink1URL=http://www.onsemi.com/, ComponentLink2Description=Datasheet, ComponentLink2URL=http://www.onsemi.com/pub_link/Collateral/PZT3904T1-D.PDF, ComponentLink3Description="Package Specification", ComponentLink3URL=http://www.onsemi.com/pub_link/Collateral/318E-04.PDF, DatasheetVersion="Rev. 6", fT Min (MHz)=300, IC Continuous (A)=0.2, Mounting Technology="Surface Mount", PackageDescription="4-Pin Small Outline Transistor, Body 6.5 x 3.5 mm, Pitch 2.3 mm", PackageReference=SOT-223-4-318E-04, PackageVersion="Rev. N, 08/2009", Packing="Tape and Reel", PartNumber=PZT3904T1G, Polarity=NPN, RoHS=TRUE
Q8: library part CMP-22018-000005-1, "OPTOISOLATOR 5KV 2CH TRANS 8-SMD", Case/Package=SMD/SMT, Collector Emitter Saturation Voltage=200mV, Collector Emitter Voltage (VCEO)=35V, Current Transfer Ratio=600%, Forward Current=50mA, Forward Voltage=1.4V, Isolation Voltage=5kV, Max Operating Temperature=110°C, Max Power Dissipation=200mW, Min Operating Temperature=-30°C, Package Quantity=1000, Reverse Breakdown Voltage=6V, Fall Time=18000ns, Lead Free="Lead Free", Max Collector Current=50mA, Max Input Current=50mA, Max Output Voltage=35V, Mount="Surface Mount", Number Of Channels=2, Number of Circuits=2, Number of Elements=2, Number of Pins=8, Output Current per Channel=50mA, Output Voltage=35V, Packaging="Tape and Reel", Power Dissipation=200mW, Radiation Hardening=No, Rise Time=18000ns
R1 R5: library part CMP-03412-017249-1, "RT1206FRE071K02L / RES SMD 1.02K OHM 1% 1/4W 1206", Manufacturer=Yageo, Manufacturer Part Number=RT1206FRE071K02L, Package=RT1206, Power Rating=0.25W, Resistance=1.02KΩ, Temperature="-55°C to +155°C", Temperature Coefficient="50 ppm/°C", Temperature Range High=+155°C, Temperature Range Low=-55°C, Tolerance=0.0002, Voltage Rating=200V, Automotive=No, Category=Res, ComponentLink2Description=Datasheet, ComponentLink2URL=http://www.yageo.com/documents/recent/PYu-RT_1-to-0.01_RoHS_L_9.pdf, Composition="Thin Film", Device Class L1="Passive Components", Device Class L2=Resistors, Device Class L3="Chip SMD Resistors", Digikey Description="RES SMD 1.02K OHM 1% 1/4W 1206", Footprint Url=http://www.yageo.com/exep/pages/download/literatures/PYu-R_Mount_10.pdf, Height=0.65mm, Ipc Land Pattern Name=RESC310160X55, Lead Free=Yes, Mouser Description="Thin Film Resistors - SMD 1/4W 1.02K ohm 1% 50ppm", Octopart=https://octopart.com/rt1206fre071k02l-yageo-1242575, RoHS=TRUE, Series=RT
R2: library part CMP-2003-04092-2, "RT1206FRE0747KL / RES SMD 47K OHM 1% 1/4W 1206", Manufacturer=Yageo, Manufacturer Part Number=RT1206FRE0747KL, Package=RT1206, Power Rating=0.25W, Resistance=47KΩ, Temperature="-55°C to +155°C", Temperature Coefficient="50 ppm/°C", Temperature Range High=+155°C, Temperature Range Low=-55°C, Tolerance=0.0002, Voltage Rating=200V, Automotive=No, Category=Res, ComponentLink2Description=Datasheet, ComponentLink2URL=http://www.yageo.com/documents/recent/PYu-RT_1-to-0.01_RoHS_L_9.pdf, Composition="Thin Film", Device Class L1="Passive Components", Device Class L2=Resistors, Device Class L3="Chip SMD Resistors", Digikey Description="RES SMD 47K OHM 1% 1/4W 1206", Footprint Url=http://www.yageo.com/exep/pages/download/literatures/PYu-R_Mount_10.pdf, Height=0.65mm, Ipc Land Pattern Name=RESC310160X55, Lead Free=Yes, Mouser Description="Thin Film Resistors - SMD 1/4W 47K ohm 1% 50ppm", Octopart=https://octopart.com/rt1206fre0747kl-yageo-1208366, RoHS=TRUE, Series=RT
R3 R6 R7 R16 R17: library part CMP-2003-04091-2, "RT1206FRE0710RL / RES SMD 10 OHM 1% 1/4W 1206", Manufacturer=Yageo, Manufacturer Part Number=RT1206FRE0710RL, Package=RT1206, Power Rating=0.25W, Resistance=10Ω, Temperature="-55°C to +155°C", Temperature Coefficient="50 ppm/°C", Temperature Range High=+155°C, Temperature Range Low=-55°C, Tolerance=0.0002, Voltage Rating=200V, Automotive=No, Category=Res, ComponentLink2Description=Datasheet, ComponentLink2URL=http://www.yageo.com/documents/recent/PYu-RT_1-to-0.01_RoHS_L_9.pdf, Composition="Thin Film", Device Class L1="Passive Components", Device Class L2=Resistors, Device Class L3="Chip SMD Resistors", Digikey Description="RES SMD 10 OHM 1% 1/4W 1206", Footprint Url=http://www.yageo.com/exep/pages/download/literatures/PYu-R_Mount_10.pdf, Height=0.65mm, Ipc Land Pattern Name=RESC310160X55, Lead Free=Yes, Mouser Description="High Precision-High Stability Chip Resistor Thin Film 1206 10Ohm 1% Paper T/R", Octopart=https://octopart.com/rt1206fre0710rl-yageo-1385105, RoHS=TRUE, Series=RT
R4 R8 R9 R10 R21 R22 R26: library part CMP-2003-04299-2, "RT1206FRE0710KL / RES 10.0K OHM 1/4W 1% SMD 1206", Manufacturer=Yageo, Manufacturer Part Number=RT1206FRE0710KL, Package=RT1206, Power Rating=0.25W, Resistance=10KΩ, Temperature="-55°C to +155°C", Temperature Coefficient="50 ppm/°C", Temperature Range High=+155°C, Temperature Range Low=-55°C, Tolerance=0.0002, Voltage Rating=200V, Automotive=No, Category=Res, ComponentLink2Description=Datasheet, ComponentLink2URL=http://www.yageo.com/documents/recent/PYu-RT_1-to-0.01_RoHS_L_9.pdf, Composition="Thin Film", Device Class L1="Passive Components", Device Class L2=Resistors, Device Class L3="Chip SMD Resistors", Digikey Description="RES 10.0K OHM 1/4W 1% SMD 1206", Footprint Url=http://www.yageo.com/exep/pages/download/literatures/PYu-R_Mount_10.pdf, Height=0.65mm, Ipc Land Pattern Name=RESC310160X55, Lead Free=Yes, Mouser Description="Thin Film Resistors 1/4W 10K ohm 1% 50ppm", Octopart=https://octopart.com/rt1206fre0710kl-yageo-1169575, RoHS=TRUE, Series=RT
R11 R12 R13 R14 R15: library part CMP-2003-04318-2, "RT1206FRE074K7L / RES SMD 4.7K OHM 1% 1/4W 1206", Manufacturer=Yageo, Manufacturer Part Number=RT1206FRE074K7L, Package=RT1206, Power Rating=0.25W, Resistance=4.7KΩ, Temperature="-55°C to +155°C", Temperature Coefficient="50 ppm/°C", Temperature Range High=+155°C, Temperature Range Low=-55°C, Tolerance=0.0002, Voltage Rating=200V, Automotive=No, Category=Res, ComponentLink2Description=Datasheet, ComponentLink2URL=http://www.yageo.com/documents/recent/PYu-RT_1-to-0.01_RoHS_L_9.pdf, Composition="Thin Film", Device Class L1="Passive Components", Device Class L2=Resistors, Device Class L3="Chip SMD Resistors", Digikey Description="RES SMD 4.7K OHM 1% 1/4W 1206", Footprint Url=http://www.yageo.com/exep/pages/download/literatures/PYu-R_Mount_10.pdf, Height=0.65mm, Ipc Land Pattern Name=RESC310160X55, Lead Free=Yes, Mouser Description="Res Thin Film 1206 4.7K Ohm 1% 0.25W(1/4W) ?50ppm/C Molded SMD Paper T/R", Octopart=https://octopart.com/rt1206fre074k7l-yageo-1218966, RoHS=TRUE, Series=RT
R18 R19 R20: library part CMP-2003-04272-2, "RT1206BRD07100KL / RES 100K OHM 1/4W .1% SMD 1206", Manufacturer=Yageo, Manufacturer Part Number=RT1206BRD07100KL, Package=RT1206, Power Rating=0.25W, Resistance=100KΩ, Temperature="-55°C to +155°C", Temperature Coefficient="25 ppm/°C", Temperature Range High=+155°C, Temperature Range Low=-55°C, Tolerance=0.005, Voltage Rating=200V, Automotive=No, Category=Res, ComponentLink2Description=Datasheet, ComponentLink2URL=http://www.yageo.com/documents/recent/PYu-RT_1-to-0.01_RoHS_L_9.pdf, Composition="Thin Film", Device Class L1="Passive Components", Device Class L2=Resistors, Device Class L3="Chip SMD Resistors", Digikey Description="RES 100K OHM 1/4W .1% SMD 1206", Footprint Url=http://www.yageo.com/exep/pages/download/literatures/PYu-R_Mount_10.pdf, Height=0.65mm, Ipc Land Pattern Name=RESC310160X55, Lead Free=Yes, Mouser Description="Res Thin Film 1206 100K Ohm 0.1% 0.25W(1/4W) ±25ppm/C Epoxy Pad SMD T/R", Octopart=https://octopart.com/rt1206brd07100kl-yageo-1375718, RoHS=TRUE, Series=RT
R23 R24: library part CMP-2003-04104-2, "RT1206FRE07680RL / RES SMD 680 OHM 1% 1/4W 1206", Manufacturer=Yageo, Manufacturer Part Number=RT1206FRE07680RL, Package=RT1206, Power Rating=0.25W, Resistance=680Ω, Temperature="-55°C to +155°C", Temperature Coefficient="50 ppm/°C", Temperature Range High=+155°C, Temperature Range Low=-55°C, Tolerance=0.0002, Voltage Rating=200V, Automotive=No, Category=Res, ComponentLink2Description=Datasheet, ComponentLink2URL=http://www.yageo.com/documents/recent/PYu-RT_1-to-0.01_RoHS_L_9.pdf, Composition="Thin Film", Device Class L1="Passive Components", Device Class L2=Resistors, Device Class L3="Chip SMD Resistors", Digikey Description="RES SMD 680 OHM 1% 1/4W 1206", Footprint Url=http://www.yageo.com/exep/pages/download/literatures/PYu-R_Mount_10.pdf, Height=0.65mm, Ipc Land Pattern Name=RESC310160X55, Lead Free=Yes, Mouser Description="Res Thin Film 1206 680 Ohm 1% 1/4W ±50ppm/°C Molded SMD SMD Paper T/R", Octopart=https://octopart.com/rt1206fre07680rl-yageo-1466321, RoHS=TRUE, Series=RT
R25: library part CMP-2003-04314-2, "RT1206FRE073K3L / RES SMD 3.3K OHM 1% 1/4W 1206", Manufacturer=Yageo, Manufacturer Part Number=RT1206FRE073K3L, Package=RT1206, Power Rating=0.25W, Resistance=3.3KΩ, Temperature="-55°C to +155°C", Temperature Coefficient="50 ppm/°C", Temperature Range High=+155°C, Temperature Range Low=-55°C, Tolerance=0.0002, Voltage Rating=200V, Automotive=No, Category=Res, ComponentLink2Description=Datasheet, ComponentLink2URL=http://www.yageo.com/documents/recent/PYu-RT_1-to-0.01_RoHS_L_9.pdf, Composition="Thin Film", Device Class L1="Passive Components", Device Class L2=Resistors, Device Class L3="Chip SMD Resistors", Digikey Description="RES SMD 3.3K OHM 1% 1/4W 1206", Footprint Url=http://www.yageo.com/exep/pages/download/literatures/PYu-R_Mount_10.pdf, Height=0.65mm, Ipc Land Pattern Name=RESC310160X55, Lead Free=Yes, Mouser Description="Thin Film Resistors - SMD 1/4W 3.3K ohm 1% 50ppm", Octopart=https://octopart.com/rt1206fre073k3l-yageo-1236583, RoHS=TRUE, Series=RT
TP1: library part CMP-00028-00002-2, "0.6mm round", Pins=1
U1: library part CMP-09131-000172-1, "LTC4359IS8#PBF / IDEAL DIODE CONTROLLER WITH REVE", RoHS Compliant=Yes
U2: library part CMP-1557-00014-2, "SENSOR CURRENT HALL 12.5A AC/DC", Case/Package=SOIC, Current Sensing=12.5A, Frequency=100kHz, Max Operating Temperature=85°C, Max Supply Current=5.5mA, Min Operating Temperature=-40°C, Operating Supply Voltage=3.3V, Package Quantity=1, -3db Bandwidth=100kHz, Accuracy=5%, Linearity=1%, Number Of Channels=1, Number of Pins=8, Packaging="Tape and Reel", Polarity=Bidirectional, Response Time=4.6us, RoHS Compliant=Yes, Sensitivity=110mV/A, Series=-
U3: library part CMP-01539-104759533-1, "TSR 1-4850WI DC-DC Converter, POL, Industrial, Encapsulated, 1A, 5V Out, 9-72V In", Output Power=5W, NexarPartId=104759533
U4: library part CMP-01539-104759529-1, "TSR 1-48120WI DC-DC Converter, POL, Industrial, Encapsulated, 1A, 12V Out, 17-72V In", Output Power=12W, NexarPartId=104759529
U5: library part CMP-00572-88252434-2, "Driver 2.5A 4-OUT Hi/Lo Side Full Brdg/Half Brdg Inv/Non-Inv Automotive 20-Pin PDIP Tube", Case/Package=PDIP, Manufacturer Lifecycle Status=ACTIVE, Max Operating Temperature=85°C, Max Output Current=2.5A, Max Output Voltage=15V, Max Power Dissipation=440mW, Max Supply Current=15.5mA, Min Operating Temperature=-40°C, Min Supply Voltage=9.5V, Nominal Supply Current=10.5mA, Output Voltage=12.6V, Switching Frequency=1MHz, ComponentLink1Description="Manufacturer's Website", ComponentLink1URL=http://www.renesas.com, ComponentLink2Description="Datasheet URL", ComponentLink2URL=https://octopart.com/cad-content/api/get-model-datasheet/15189/88252434, ComponentLink3Description="Manufacturer's Package Drawing", ComponentLink3URL=https://www.renesas.com/en/document/psc/e203-20-lead-dual-line-plastic-packages, Export Control Classification Number (ECCN) Code=EAR99, Fall Time=10ns, Height=3.94mm, HelpURL=https://octopart.com/cad-content/api/get-model-datasheet/15189/88252434, Lead Free="Lead Free", Length=26.2mm, Lifecycle Status=Production, Max Supply Voltage=15V, Mount="Through Hole", Number Of Channels=4, Number of Drivers=1, Number of Outputs=4, Number of Pins=20, Output Current=2.5A, Overload Protection="Under Voltage", Packaging=Bulk, Pitch=2.5mm, Propagation Delay=30ns, RAM Size=32kB, REACH SVHC=No, Rise Time=10ns, RoHS=Compliant, Turn-Off Delay Time=90ns, Turn-On Delay Time=110ns, Width=6.6mm

## Free pads (board coordinates)
  round 3.2 hole 3.2 unplated: MH1(5,160) MH2(160,160) MH3(160,5) MH4(5,5)

## Via types
v1: diameter 1, hole 0.4, Top Layer to Bottom Layer, 54 vias
v2: diameter 2, hole 1, Top Layer to Bottom Layer, 4 vias

## Nets (pads, with @x,y where several pads share a name; then routed paths per layer and width w, separated by ;. In a path a pad name is that pad's centre, name@x,y a point inside that pad or via, vN(x,y) a via of type N, cw(c..) or ccw(c..) an arc to the next point about the centre after c; other vN are vias at no path point)
3V3_STM32: C3.1 J6.16 R23.1 R25.1 R26.1 U2.8 | length 119.4
  Top Layer w0.8: R26.1@56.6,60 65.34,60 ccw(c65.34,60.8) 65.959,60.294 J6.16@67.42,62.08 66.54,62.08 ; R25.1@56.6,70 56.6,64.62 ccw(c59.14,64.62) 59.14,62.08 66.54,62.08 ; v1(75,93) 66.54,93 ccw(c66.54,90.46) 64,90.46 64,64.62 ccw(c66.54,64.62) 66.54,62.08 ; U2.8@112.316,91.405 115.293,91.405 ; v1(115.5,93) 115.5,91.905 cw(c114.793,91.905) 115.293,91.405 ; C3.1@117.5,90.25 117.089,90.661 ccw(c115.293,88.865) 115.293,91.405
  Bottom Layer w0.8: v1(75,93) v1(115.5,93)
5V_STM32: C22.2 J6.6 U3.3 | length 121.6
  Top Layer w0.6: C22.2@93,115.85 95.366,118.216 cw(c97.162,116.42) 97.162,118.96 U3.3@102.5,118.96
  Top Layer w0.8: J6.6@67.42,49.38 ccw(c67.42,46.96) 65,46.96 65,42 ccw(c67,42) 67,40 75,40 ccw(c75,42) 77,42 77,108 cw(c79,108) 79,110 90.46,110 ccw(c90.46,112.54) 93,112.54 C22.2@93,115.85
12V_DRIVER: C19.1 C20.2 C24.2 D5.2 D6.2 R10.1 U4.3 U5.15 U5.16 | length 263.5
  Top Layer w1: v1@17.9,26.1 v1(18,26) 18,30.4 ccw(c17.9,30.4) R10.1@17.9,30.5 ; D5.2@48.15,5.5 48.241,5.875 v1(49,9) ; D6.2@48.15,43 48.15,40.85 ccw(c49,40.85) v1(49,40) ; U4.3@102.5,101.96 105.866,98.594 ccw(c107.662,100.39) 107.662,97.85 C24.2@109.5,97.85 C19.1@114.5,97.85 116.85,97.85 ccw(c116.85,100) 119,100 119,106.71 ccw(c116.46,106.71) 116.46,109.25 C20.2@114,109.25
  Bottom Layer w1: v1(18,26) 37.46,26 ccw(c37.46,28.54) 40,28.54 40,37 cw(c42,37) 42,39 cw(c42,36.5) 44.5,36.5 44.5,27 ccw(c46.08,27) 46.08,25.42 U5.16@50.12,25.42 ; v1(49,9) cw(c49,9.5) 48.5,9.5 48.5,23.8 cw(c50.12,23.8) U5.16@50.12,25.42 ; v1(49,40) ccw(c49,39.5) 48.5,39.5 48.5,27.04 ccw(c50.12,27.04) U5.16@50.12,25.42 ; U5.15@50.12,22.88 U5.16@50.12,25.42 ; U4.3@102.5,101.96 75.54,101.96 ccw(c75.54,99.42) 73,99.42 73,52 cw(c73,51) 74,51 74,27.96 cw(c71.46,27.96) 71.46,25.42 U5.16@50.12,25.42
BAT_IN+: C1.1 J2.1 Q2.4 U1.8
BAT_OUT+: F2.1 J3.1